# Altium PCB PCB1.PcbDoc (part 1 of 3)
Units mm, origin at the board's own origin, x right, y up, seen from the top; angles counter-clockwise.
Board outline 82.55 x 101.6 mm, 4 copper layers (Top Layer, GND, POWER, Bottom Layer), stack 1.586 mm thick; 125 components, 82 nets, 451 pads, 255 vias.
Unrouted connection lines stored in the file: 4.
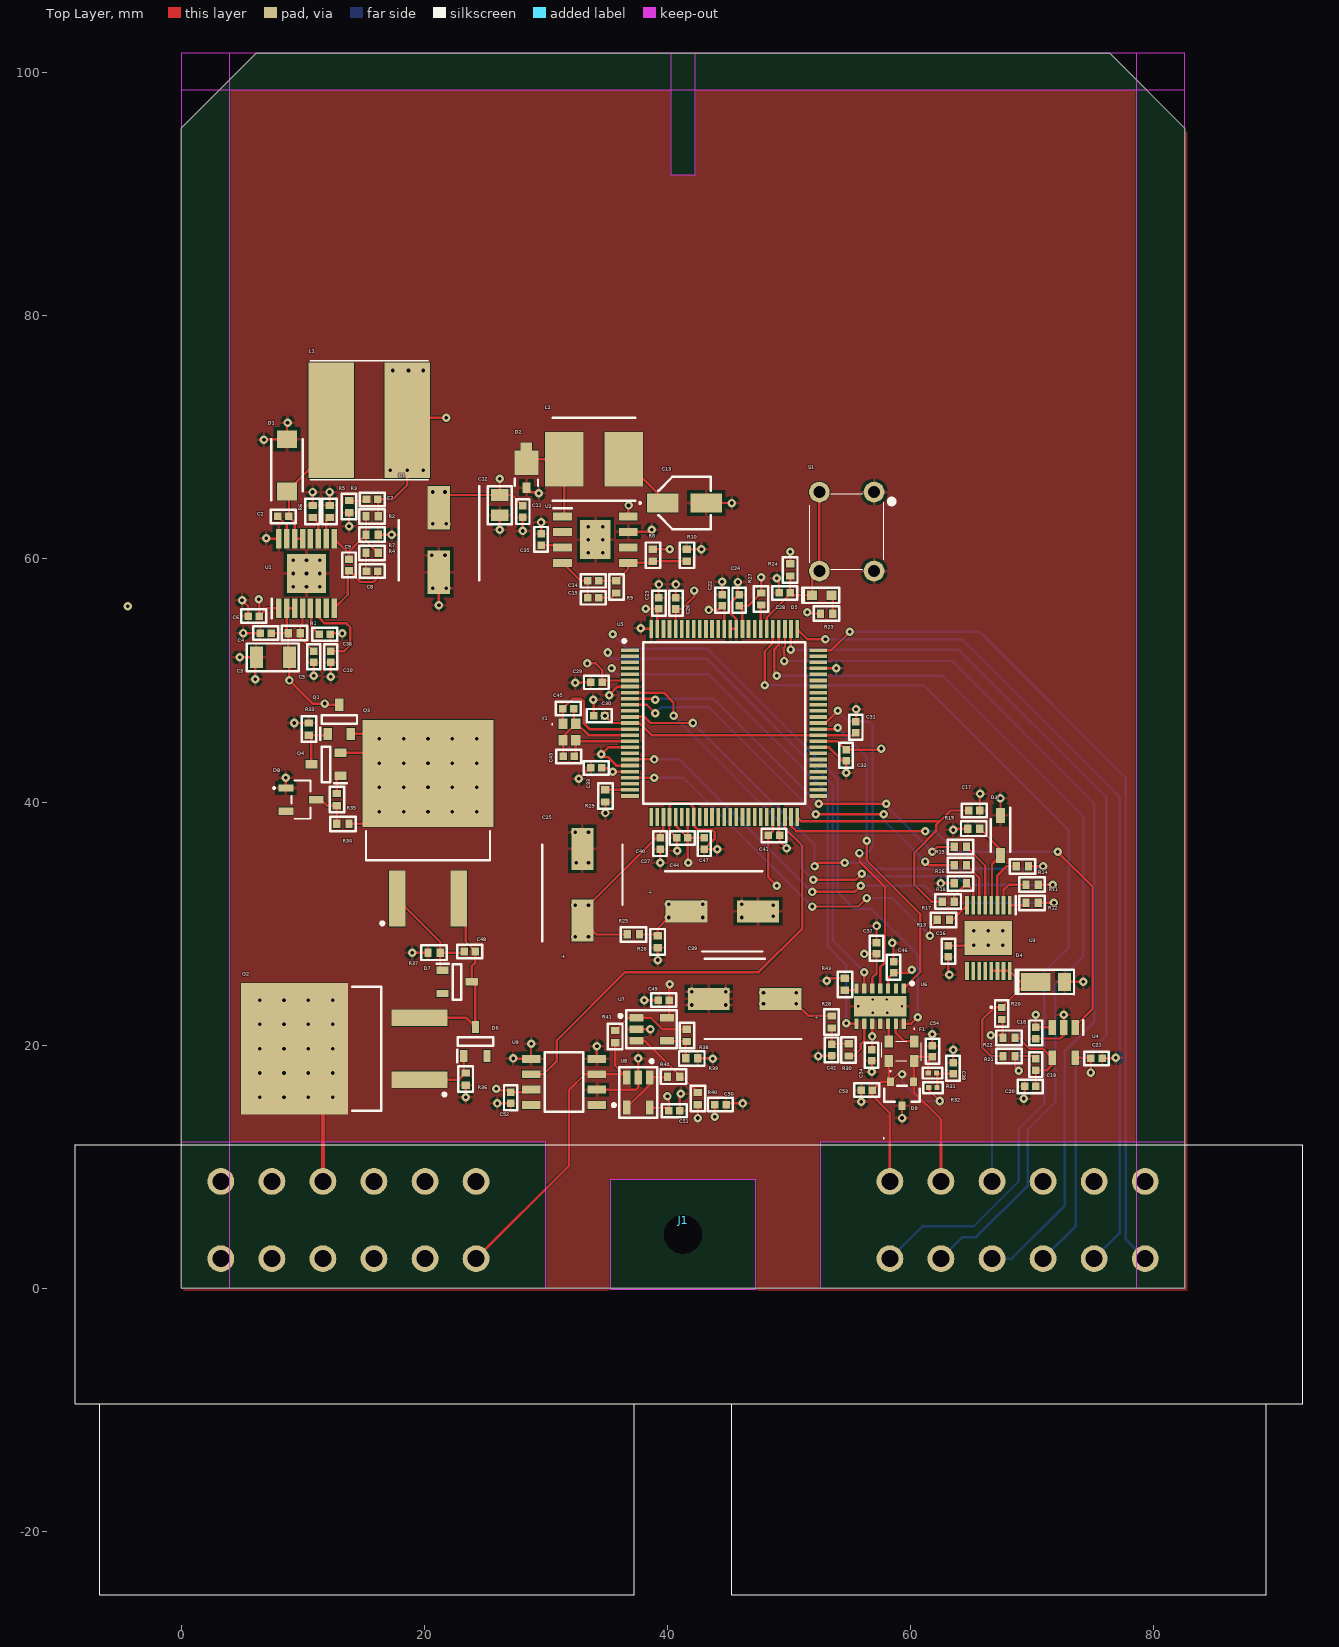
[diagram p0: Top Layer view]
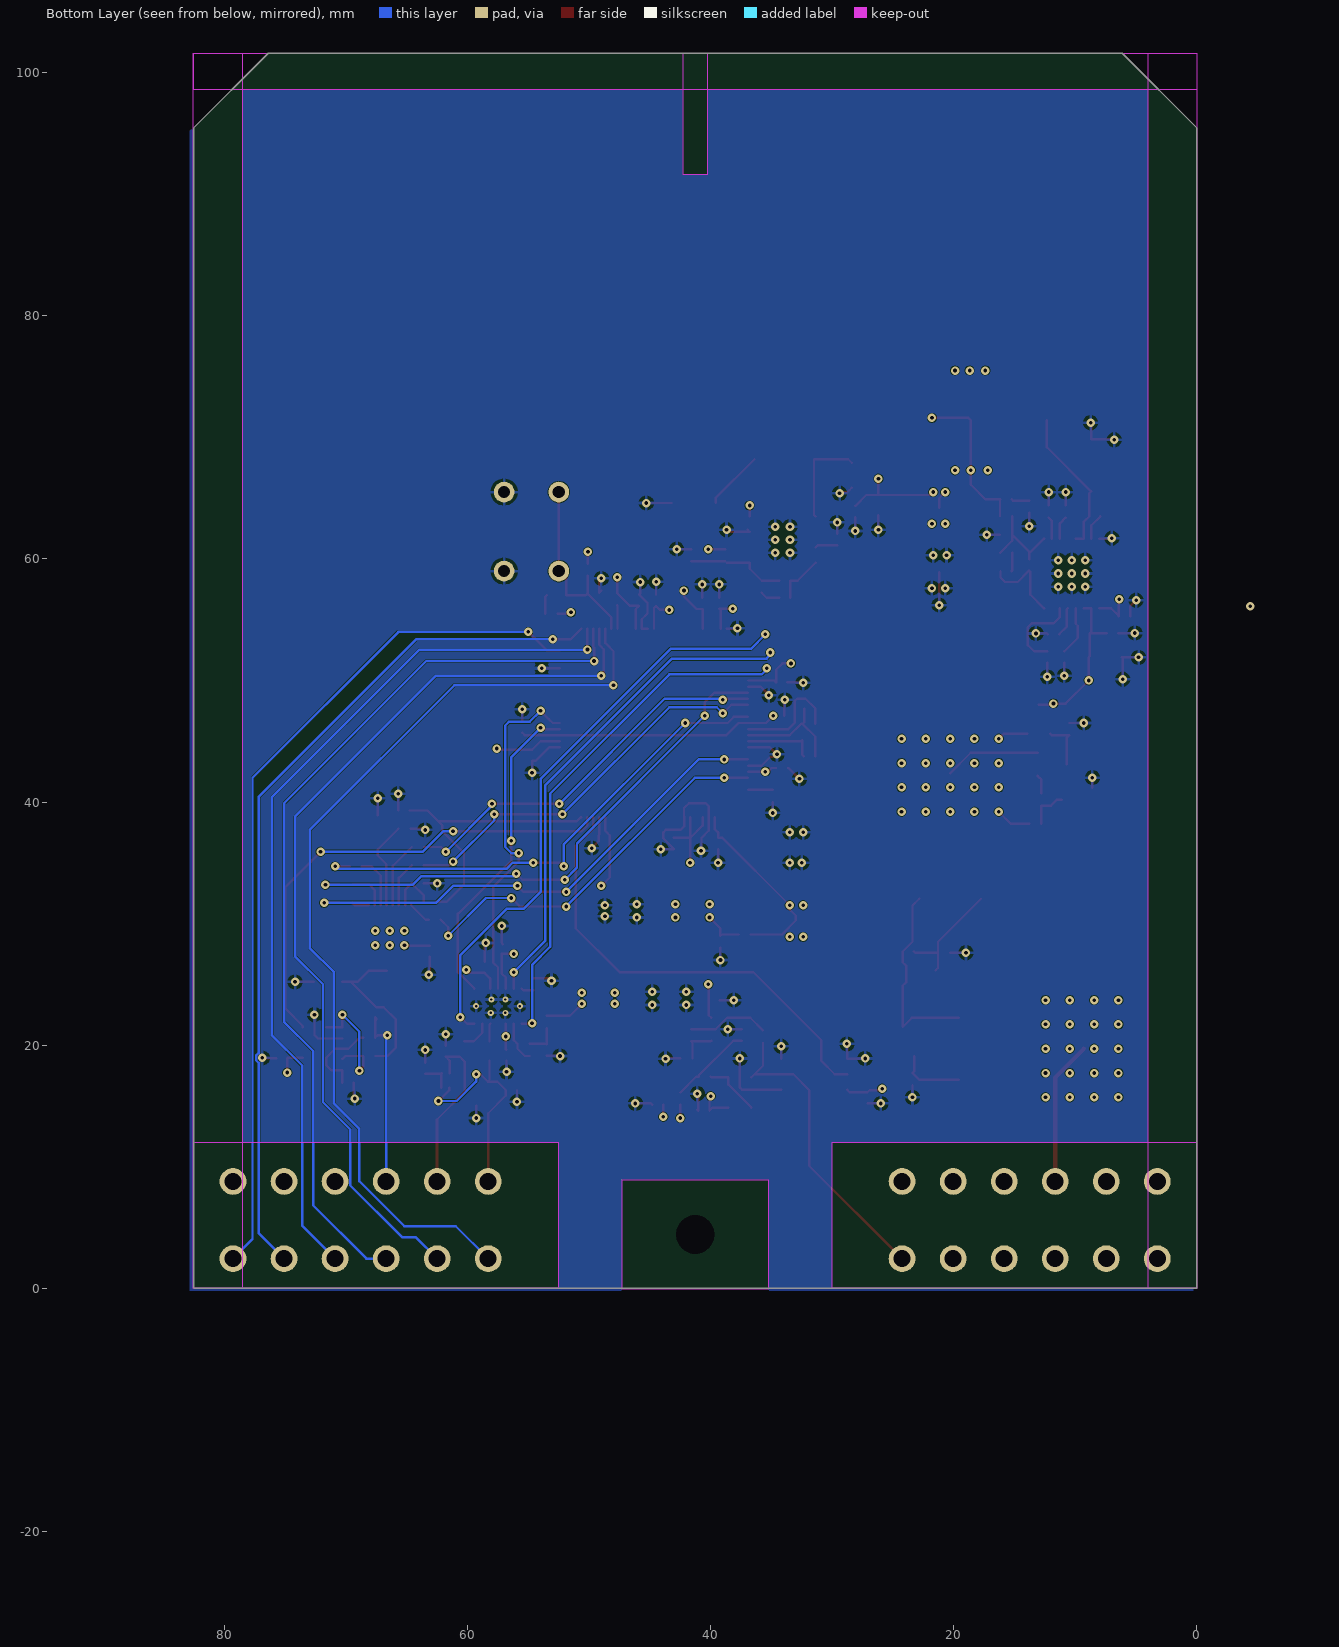
[diagram p1: Bottom Layer view, seen from below]
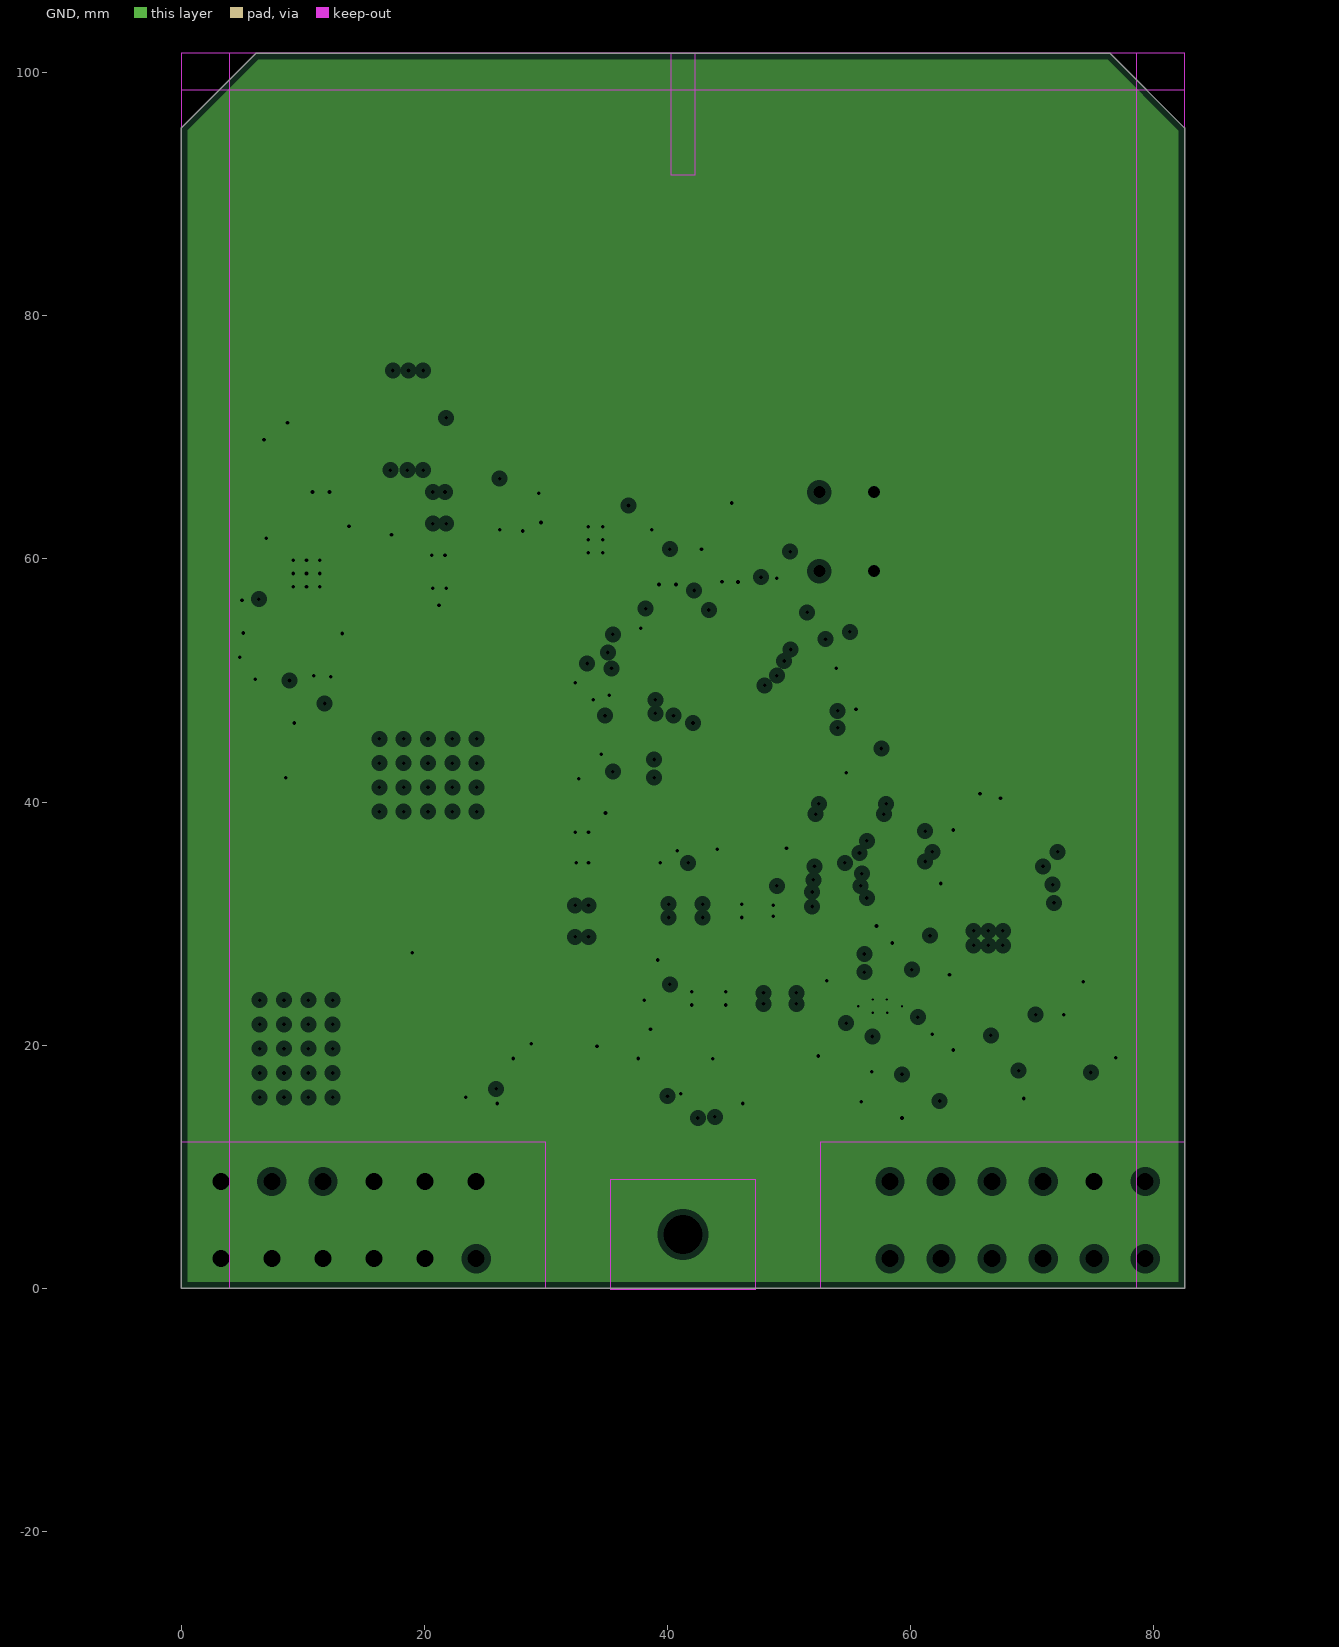
[diagram p2: GND, clearances drawn from the general rule]
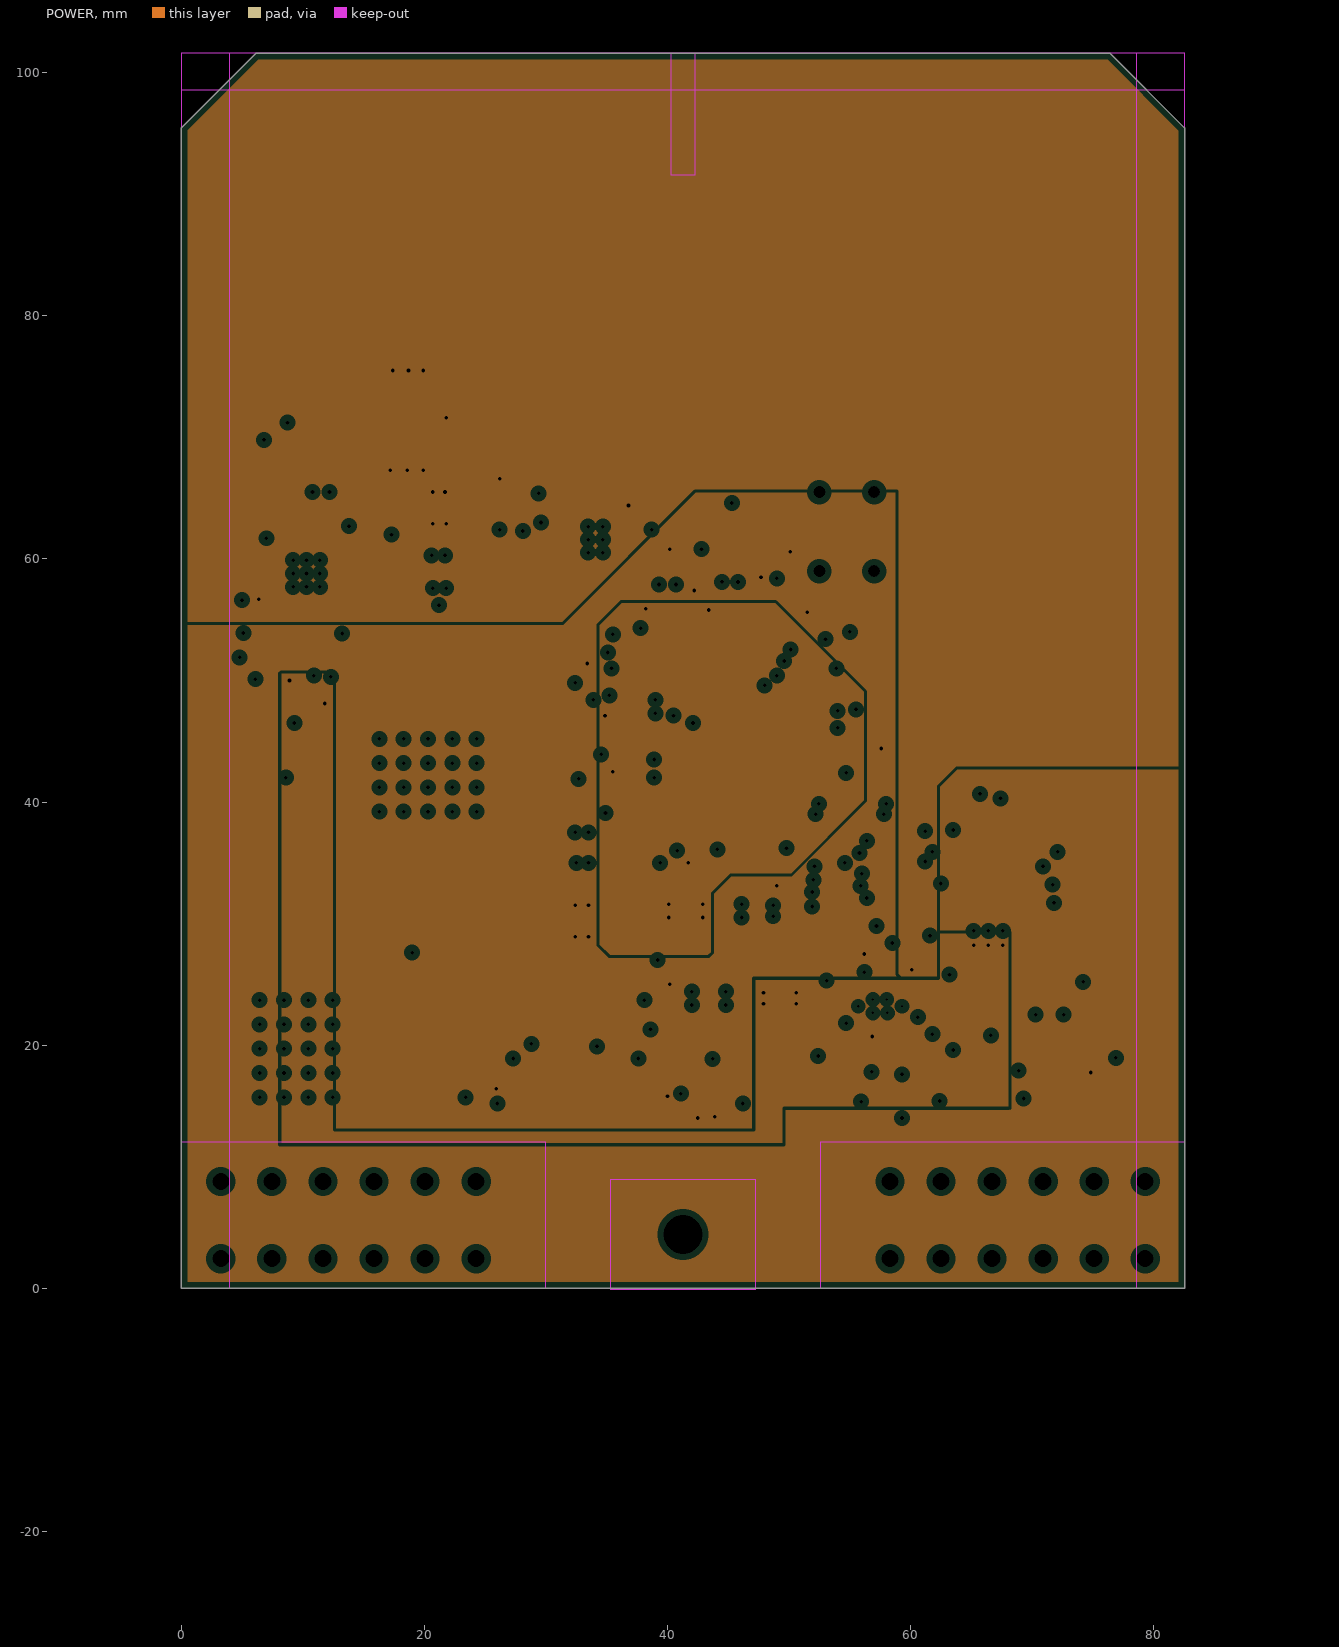
[diagram p3: POWER, clearances drawn from the general rule]
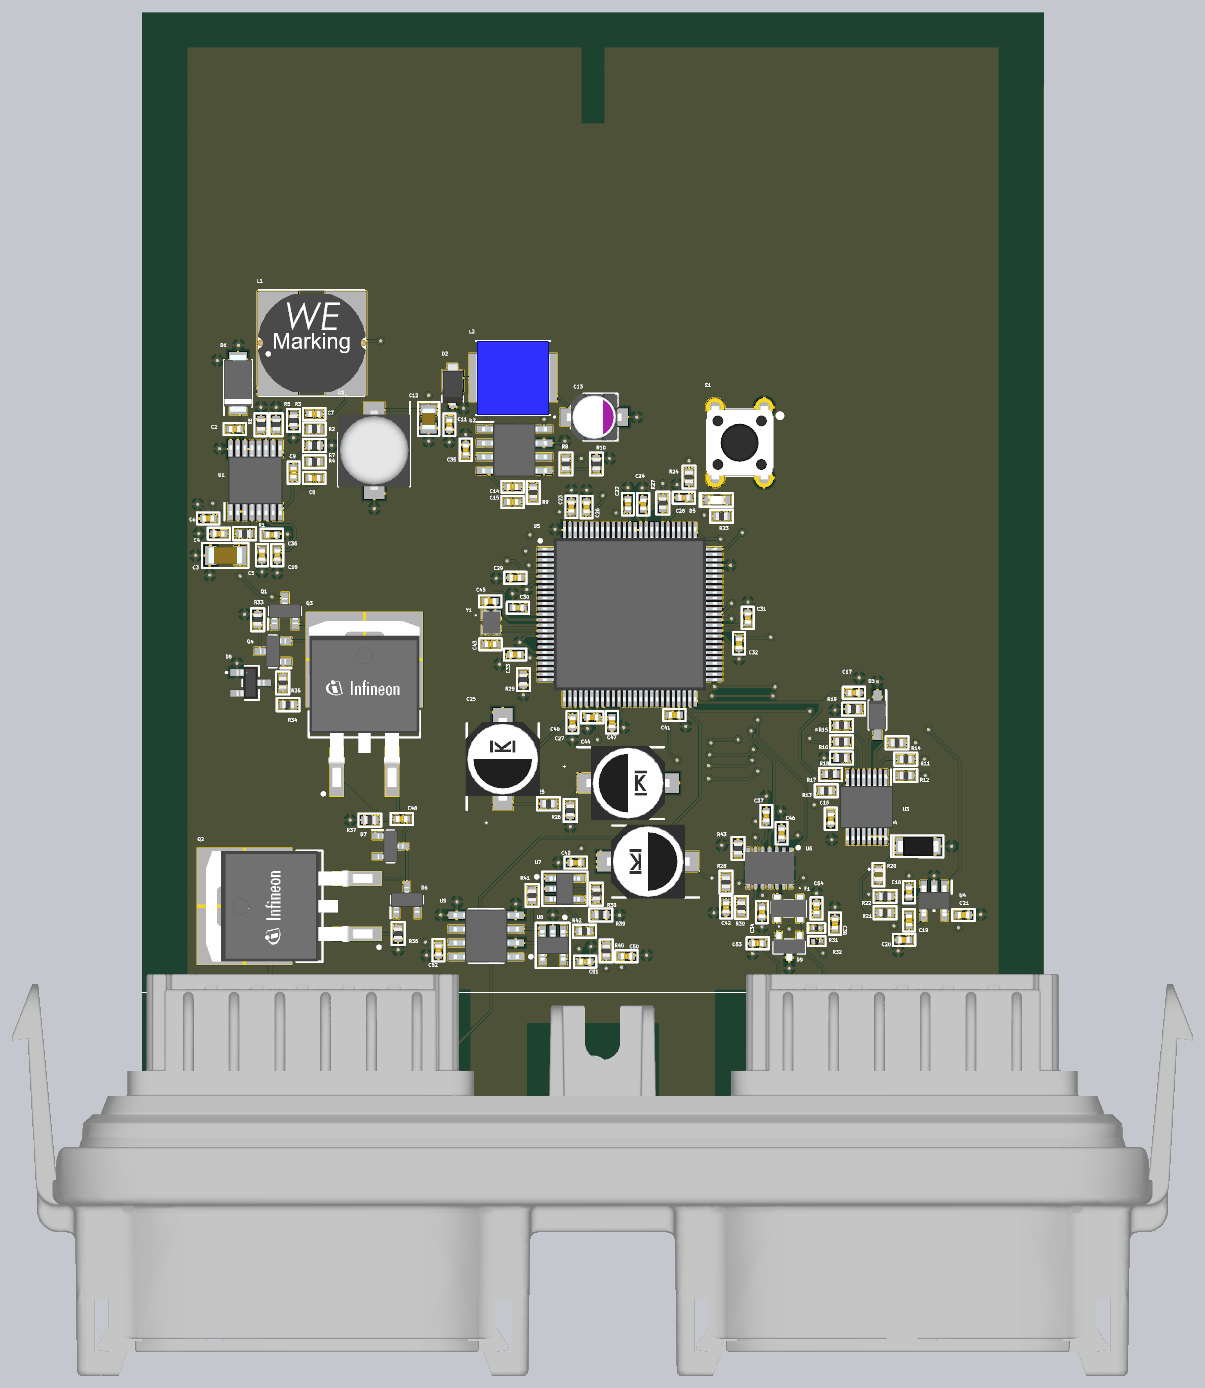
[diagram p5: 3D render of the assembled board from above, using the file's embedded part models]

## Layer stack, top to bottom
Top Solder: solder mask 0.0102, Solder Resist, Dk 3.5
Top Layer: signal copper 0.035
Dielectric 2: prepreg 0.2104, PP-006, Dk 4.1
GND: plane copper 0.0152, net GND
Dielectric 1: core 1.065, FR-4, Dk 4.8
POWER: plane copper 0.0152, net (Multiple Nets)
Dielectric 3: prepreg 0.2104, PP-006, Dk 4.1
Bottom Layer: signal copper 0.035
Bottom Solder: solder mask 0.0102, Solder Resist, Dk 3.5

## Board outline
0,0 0,95.456 6.144,101.6 76.406,101.6 82.55,95.456 82.55,0

## Design rules (kind name [scope] priority, off if disabled: settings)
Clearance [All] p1: gap=0.05 ignorepadtopadclearanceinfootprint=FALSE
DiffPairsRouting [All] p1: maxlimit=3 minlimit=0.07 mostfreqgap=1 toplayer_minwidth=0.2 toplayer_maxwidth=0.25 toplayer_prefwidth=0.25 bottomlayer_minwidth=0.2 bottomlayer_maxwidth=0.25 bottomlayer_prefwidth=0.25 maxuncoupledlength=12.7
HoleToHoleClearance [All] p1: gap=0.05 allowstackedmicrovias=TRUE
MinimumSolderMaskSliver [All] p1: minsoldermaskwidth=0.05
PlaneClearance [All] p1: clearance=0.508
PlaneConnect [All] p1: planeconnectstyle=Relief reliefexpansion=0.508 reliefentries=4 reliefconductorwidth=0.254 reliefairgap=0.254
PolygonConnect [All] p1: connectstyle=Relief reliefconductorwidth=0.254 reliefentries=4 polygonreliefangle="90 Angle" airgapwidth=0.254
RoutingVias [All] p1: holewidth=0.3 width=0.7 viastyle="Through Hole" minholewidth=0.3 minwidth=0.7 maxholewidth=0.3 maxwidth=0.7
SilkToSilkClearance [All] p1: silktosilkclearance=0.05
SilkToSolderMaskClearance [IsPad] p1: minsilkscreentomaskgap=0.05 clearancetoexposedcopper=TRUE
SolderMaskExpansion [All] p1: expansion=0.102 istentingtop=FALSE
SupplyNets "Schematic Supply Nets_5" [InNet('VBAT')] p1: voltage=0.000
SupplyNets "Schematic Supply Nets_4" [InNet('3V3')] p2: voltage=0.000
SupplyNets "Schematic Supply Nets_3" [InNet('1V2')] p3: voltage=0.000
SupplyNets "Schematic Supply Nets_2" [InNet('12V')] p4: voltage=0.000
SupplyNets "Schematic Supply Nets_1" [InNet('5V')] p5: voltage=0.000
SupplyNets "Schematic Supply Nets" [InNet('GND')] p6: voltage=0.000
Width [All] p1: maxlimit=0.35 minlimit=0.2 preferedwidth=0.2
23 further rules are at their usual default settings.

## Classes and differential pairs
component class NTC: C49 C50 C51 C52 R38 R39 R40 R41 R42 U7 U8 U9
component class Shunt: C18 C19 C20 C21 C34 C37 C38 C39 C42 C46 C53 C54 D9 F1 R20 R21 R22 R28 R30 R31 R32 R43 U4 U6
component class "Pump Driver": C16 C17 D3 D4 R11 R12 R13 R14 R15 R16 R17 R18 R19 U3
component class "Power Supply": C1 C2 C3 C4 C5 C6 C7 C8 C9 C10 C11 C12 C13 C14 C15 C35 C36 D1 D2 L1 L2 R1 R2 R3 R4 R5 R6 R7 R8 R9 R10 U1 U2
component class Microcontroller: C22 C23 C24 C25 C26 C27 C28 C29 C30 C31 C32 C33 C40 C41 C43 C44 C45 C47 D5 R23 R24 R25 R26 R27 R29 S1 U5 Y1
component class "Input Stage": C48 D6 D7 D8 J1 Q1 Q2 Q3 Q4 R33 R34 R35 R36 R37
differential pair CAN: +CAN_P -CAN_N

## Components (designator, comment, footprint, x,y, rotation, side; value= is the part's Value field where it differs from the comment)
C1 "15uF" CAPAE660X850N 21.2,61.55 r270 top
C2 "100nF" C0402 8.4,63.5 r0 top
C3 "4.7uF" CAPC3216X180N 7.54,51.9 r0 top
C4 "1uF" C0402 6.94,53.9 r0 top
C5 "1uF" C0402 10.9,51.94 r90 top
C6 "1uF" C0402 5.96,55.3 r180 top
C7 "680pF" C0402 15.7,64.9 r0 top
C8 "27nF" C0402 15.7,59 r180 top
C9 "220pF" C0402 13.8,59.5 r270 top
C10 "33nF" C0402 12.3,51.94 r90 top
C11 "220nF" C0402 28.1,63.9 r270 top
C12 "10uF" CAPC2012X145N 26.2,64.43 r90 top
C13 "33uF" 10SVPS10M 41.4,64.6 r0 top
C14 "270pF" C0402 33.9,58.2 r0 top
C15 "100nF" C0402 33.9,56.8 r0 top
C16 "100nF" C0402 63.119,27.73 r90 top
C17 "10nF" C0402 65.24,39.3 r180 top
C18 "1nF" C0402 70.3,21 r90 top
C19 "10nF" C0402 70.3,18.4 r270 top
C20 "1nF" C0402 69.84,16.6 r180 top
C21 "1uF" C0402 75.3,18.9 r180 top
C22 "100nF" C0402 44.5,56.6 r270 top
C23 "100nF" C0402 39.3,56.36 r270 top
C24 "100nF" C0402 45.9,56.6 r270 top
C25 "10uF" CAPAE660X565N 33,33.2 r90 top
C26 "100nF" C0402 40.7,56.34 r270 top
C27 "10uF" CAPAE660X565N 44.5,31 r0 top
C28 "100nF" C0402 49.64,57.2 r0 top
C29 "100nF" C0402 34.16,49.846 r0 top
C30 "100nF" C0402 34.4,47.1 r0 top
C31 "100nF" C0402 55.5,46.16 r270 top
C32 "100nF" C0402 54.7,43.84 r90 top
C33 "100nF" C0402 34.14,42.8 r0 top
C34 "100nF" C0402 56.8,19.16 r90 top
C35 "220nF" C0402 29.6,61.6 r90 top
C36 "1uF" C0402 11.8,53.8 r180 top
C37 "100nF" C0402 57.2,27.96 r270 top
C38 "4.7nF" C0402 63.5,18.1 r90 top
C39 "10uF" CAPAE660X565N 46.35,23.8 r180 top
C40 "100nF" C0402 39.395,36.585 r90 top
C41 "100nF" C0402 48.765,37.248 r180 top
C42 "22nF" C0402 53.5,19.6 r90 top
C43 "20pF" C0402 31.877,43.75 r0 top
C44 "100nF" C0402 41.221,37.045 r0 top
C45 "20pF" C0402 31.849,47.687 r180 top
C46 "100nF" C0402 58.6,26.4 r270 top
C47 "100nF" C0402 43.028,36.585 r90 top
C48 "1uF" C0402 23.74,27.7 r0 top
C49 "100nF" C0402 39.7,23.7 r0 top
C50 "100nF" C0402 44.36,15.1 r180 top
C51 "100nF" C0402 40.56,14.6 r180 top
C52 "100nF" C0402 27.1,15.66 r90 top
C53 "100pF" C0402 56.4,16.3 r180 top
C54 "100pF" C0402 61.8,19.5 r270 top
D1 "STPS2L25AFN" SODFL5226X110N 8.7,67.7 r90 top
D2 "STPS120MF" STPS120MF 28.4,67.5 r90 top
D3 "1N5819" SOD3716X125N 67.4,37.25 r270 top
D4 "DFLS1100-7" DFLS110 71.15,25.2 r0 top
D5 "150060AS75000" LED-0603 52.7,57 r0 top
D6 "BZX84C12" SOT96P237X111-3N 24.2,20.3 r90 top
D7 "BZX84C12" SOT96P237X111-3N 22.7,25.2 r0 top
D8 "BZX84B24" TRANS_BZX84_ROM-M 9.855,40.2 r270 top
D9 "PESD" PESD2CANFD36LTQR 59.3,16 r0 top
F1 "DLP31SN121ML2L" DLP31SN121ML2B 60.3,18.7 r270 top
J1 "ATM13-12PA-12PB-BM03" ATM1312PA12PBBM03 24.255,2.43 r0 top locked
L1 "12uH" WE-PD2_105455 15.475,71.4 r0 top
L2 "15uH" INDPM6868X420N 33.95,68.2 r0 top
Q1 "MMBT5401" SOT95P240X120-3N 13,46.8 r90 top
Q2 "IRF5210" TO254P1528X508-4_3N-V1 14.455,19.7 r180 top
Q3 "IRF5210" TO254P1528X508-4_3N-V1 20.3,37.2 r90 top
Q4 "MMBT5401" SOT95P240X120-3N 11.9,43.1 r180 top
R1 "0" R0402 9.3,53.9 r180 top
R2 "43k" R0402 15.7,63.5 r0 top value=43kR
R3 "1.3k" R0402 13.8,64.3 r90 top value=1.3kR
R4 "2.7k" R0402 15.7,60.5 r0 top value=2.7kR
R5 "51.1k" R0402 12.2,63.9 r270 top value=51.1kR
R6 "30k" R0402 10.8,63.9 r270 top value=30kR
R7 "8.2k" R0402 15.7,62 r180 top
R8 "4.7k" R0402 38.8,60.3 r90 top value=4.7kR
R9 "3.3k" R0402 35.8,57.7 r90 top value=3.3kR
R10 "1.05k" R0402 41.6,60.3 r270 top value=1.05kR
R11 "15k" R0402 70,33.2 r180 top
R12 "15k" R0402 70,31.7 r180 top
R13 "15k" R0402 62.7,30.3 r0 top
R14 "15k" R0402 69.2,34.7 r180 top
R15 "15k" R0402 64.1,36.3 r0 top
R16 "15k" R0402 64.1,34.8 r0 top
R17 "15k" R0402 63.1,31.8 r0 top
R18 "1k" R0402 64.1,33.3 r0 top
R19 "4.7k" R0402 65.2,37.8 r0 top value=4.7kR
R20 "10m" CSS0402FT10L0 67.5,22.6 r270 top
R21 "100R" R0402 68.1,19.1 r180 top
R22 "100R" R0402 68.1,20.6 r180 top
R23 "120R" R0402 53.1,55.5 r180 top
R24 "10k" R0402 50.1,59.1 r90 top
R25 "30k" R0402 37.2,29.1 r180 top value=30kR
R26 "17k2" R0402 39.2,28.5 r90 top value=17.2kR
R27 "10k" R0402 47.7,56.7 r90 top
R28 "3.3k" R0402 53.5,21.9 r90 top value=3.3kR
R29 "1k" R0402 34.9,40.5 r90 top
R30 "33k" R0402 54.9,19.6 r90 top
R31 "60R" R0201 61.8,17.7 r180 top
R32 "60R" R0201 61.84,16.5 r0 top
R33 "6k2" R0402 10.5,46 r90 top value=6.2kR
R34 "2k" R0402 13.3,38.2 r0 top
R35 "1k" R0402 12.8,40.2 r90 top
R36 "10R" R0402 23.4,17.2 r90 top
R37 "10R" R0402 20.8,27.6 r0 top
R38 "10k" R0402 41.6,20.8 r270 top
R39 "10k" R0402 42,18.9 r0 top
R40 "10k" R0402 42.5,15.6 r270 top
R41 "33k" R0402 35.7,20.7 r90 top
R42 "10k" R0402 40.5,17.4 r0 top
R43 "10k" R0402 54.6,25 r270 top
S1 "Pushbutton" Pushbutton 54.75,62.25 r270 top
U1 "A7987" SOP65P640X120-17N 10.3,58.8 r90 top
U2 "A7985A" SOIC127P600X170-9N 34.077,61.585 r0 top
U3 "VND7020AJ" SOP50P600X170-17N 66.4,28.8 r270 top
U4 "INA193" SOT95P280X145-5N 72.6,20.2 r270 top
U5 "TMS570" QFP50P1600X1600X160-100N 44.67,46.499 r0 top locked
U6 "TCAN1043" SON65P300X450X90-15N 57.5,23.2 r270 top
U7 "AD8538AUJZ" SOT95P280X100-5N 38.7,21.3 r0 top
U8 "AD8538AUJZ" SOT95P280X100-5N 37.6,16.1 r270 top
U9 "MAX4194" SOIC127P600X175-8N 31.488,16.965 r180 top
Y1 "16MHz" ECS1601037B2CTNTR 31.928,45.757 r270 top

## Footprints (in the part's own frame and the unit in brackets; to place one, negate y for a bottom-side part, rotate by r counter-clockwise, add the part's x,y. Pads: shape width x height; smd on the part's side, far side on the other; paste and mask are expansions set on the pad)
10SVPS10M [mm]
  rect 2.6x1.6 smd: 1(-1.8,0) 2(1.8,0)
  silkscreen extent -3.7,-2.15 2.15,2.15, body extent -2.5,-2.15 2.5,2.15, height 5.43
ATM1312PA12PBBM03 [mm]
  round 2.2 hole 1.4: A1(0,0) A2(-4.2,0) A3(-8.4,0) A4(-12.6,0) A5(-16.8,0) A6(-21,0) A7(-21,6.35) A8(-16.8,6.35) A9(-12.6,6.35) A10(-8.4,6.35) A11(-4.2,6.35) A12(0,6.35) B1(34.05,6.35) B2(38.25,6.35) B3(42.45,6.35) B4(46.65,6.35) B5(50.85,6.35) B6(55.05,6.35) B7(55.05,0) B8(50.85,0) B9(46.65,0) B10(42.45,0) B11(38.25,0) B12(34.05,0)
  round 1.6 hole 3.2 unplated: MH1(17.02,1.98)
  silkscreen extent -32.97,-27.65 68.02,9.95, body extent -36.24,-25.85 72.06,11.05, height 25.1
C0402 [mm]
  rect 0.62x0.62 smd: 1(-0.46,0) 2(0.46,0)
  silkscreen extent -1.02,-0.55 1.02,0.55, body extent -0.53,-0.28 0.53,0.27, height 0.55
CAPAE660X565N [mm]
  rect 3.45x1.8 smd: 1(-2.95,0) 2(2.95,0)
  silkscreen extent -4.67,-3.3 3.3,3.3, body extent -3.8,-3.4 3.8,3.4, height 5.66
CAPAE660X850N [mm]
  rect 3.6x1.85 smd: 1(-2.65,0) 2(2.65,0)
  silkscreen extent -4.45,-3.3 3.3,3.3, body extent -3.65,-3.3 3.65,3.3, height 8
CAPC2012X145N [mm]
  rect 0.97x1.47 smd: 1(-0.83,0) 2(0.83,0)
  silkscreen extent -1.58,-0.97 1.55,0.97, body extent -1,-0.63 1,0.63, height 1.45
CAPC3216X180N [mm]
  rect 1.07x1.78 smd: 1(-1.36,0) 2(1.36,0)
  silkscreen extent -2.16,-1.14 2.12,1.14, body extent -1.6,-0.8 1.6,0.8, height 1.8
CSS0402FT10L0 [mm]
  rect 0.6x0.6 smd: 1(-0.5,0) 2(0.5,0)
  silkscreen extent -1.07,-0.9 1.07,0.53, body extent -0.57,-0.36 0.57,0.36, height 0.41
DFLS110 [mm]
  rect 2.4x1.5 smd: 1(-0.85,0)
  rect 1.05x1.5 smd: 2(1.525,0)
  silkscreen extent -2.5,-1.02 2.3,1, body extent -1.85,-0.9 1.85,0.88, height 0.98
DLP31SN121ML2B [mm]
  rect 1x0.7 smd: 1(-1.6,0) 2(0,0) 3(0,-2.1) 4(-1.6,-2.1)
  silkscreen extent -2.7,-2.65 0,0.6, body extent -2.03,-2.65 0.43,0.55, height 1.4
ECS1601037B2CTNTR [mm]
  rect 0.85x0.75 smd: 1(-0.675,-0.525) 2(0.675,-0.525) 3(0.675,0.525) 4(-0.675,0.525)
  silkscreen extent -0.7,-1.45 -0.6,-1.35, body extent -1.02,-0.82 1.02,0.82, height 0.6
INDPM6868X420N [mm]
  rect 3.15x4.45 smd: 1(-2.45,0) 2(2.45,0)
  silkscreen extent -3.4,-3.4 3.4,3.4, body extent -3.4,-3.4 3.4,3.4, height 4.2
LED-0603 [mm]
  rect 0.8x0.8 smd: 1(-0.8,0) 2(0.8,0)
  silkscreen extent -1.63,-0.63 1.43,0.63, body extent -0.85,-0.43 0.75,0.37, height 0.81
PESD2CANFD36LTQR [mm]
  rect 0.6x0.7 smd: 1(-0.95,1) 2(0.95,1) 3(0,-1)
  silkscreen extent -1.45,-0.65 1.45,1.9, body extent -1.45,-1.29 1.45,1.29, height 1.2
Pushbutton [mm]
  round 1.7 hole 1: 1(-3.25,2.25) 2(3.25,2.25) 3(-3.25,-2.25) 4(3.25,-2.25)
  silkscreen extent -3.1,-3.05 3.1,3.9, body extent -3.9,-3 3.9,3, height 7
QFP50P1600X1600X160-100N [mm]
  rect 1.475x0.3 smd: 1(-7.738,6) 2(-7.738,5.5) 3(-7.738,5) 4(-7.738,4.5) 5(-7.738,4) 6(-7.738,3.5) 7(-7.738,3) 8(-7.738,2.5) 9(-7.738,2) 10(-7.738,1.5) 11(-7.738,1) 12(-7.738,0.5) 13(-7.738,0) 14(-7.738,-0.5) 15(-7.738,-1) 16(-7.738,-1.5) 17(-7.738,-2) 18(-7.738,-2.5) 19(-7.738,-3) 20(-7.738,-3.5) 21(-7.738,-4) 22(-7.738,-4.5) 23(-7.738,-5) 24(-7.738,-5.5) 25(-7.738,-6) 51(7.738,-6) 52(7.738,-5.5) 53(7.738,-5) 54(7.738,-4.5) 55(7.738,-4) 56(7.738,-3.5) 57(7.738,-3) 58(7.738,-2.5) 59(7.738,-2) 60(7.738,-1.5) 61(7.738,-1) 62(7.738,-0.5) 63(7.738,0) 64(7.738,0.5) 65(7.738,1) 66(7.738,1.5) 67(7.738,2) 68(7.738,2.5) 69(7.738,3) 70(7.738,3.5) 71(7.738,4) 72(7.738,4.5) 73(7.738,5) 74(7.738,5.5) 75(7.738,6)
  rect 0.3x1.475 smd: 26(-6,-7.738) 27(-5.5,-7.738) 28(-5,-7.738) 29(-4.5,-7.738) 30(-4,-7.738) 31(-3.5,-7.738) 32(-3,-7.738) 33(-2.5,-7.738) 34(-2,-7.738) 35(-1.5,-7.738) 36(-1,-7.738) 37(-0.5,-7.738) 38(0,-7.738) 39(0.5,-7.738) 40(1,-7.738) 41(1.5,-7.738) 42(2,-7.738) 43(2.5,-7.738) 44(3,-7.738) 45(3.5,-7.738) 46(4,-7.738) 47(4.5,-7.738) 48(5,-7.738) 49(5.5,-7.738) 50(6,-7.738) 76(6,7.738) 77(5.5,7.738) 78(5,7.738) 79(4.5,7.738) 80(4,7.738) 81(3.5,7.738) 82(3,7.738) 83(2.5,7.738) 84(2,7.738) 85(1.5,7.738) 86(1,7.738) 87(0.5,7.738) 88(0,7.738) 89(-0.5,7.738) 90(-1,7.738) 91(-1.5,7.738) 92(-2,7.738) 93(-2.5,7.738) 94(-3,7.738) 95(-3.5,7.738) 96(-4,7.738) 97(-4.5,7.738) 98(-5,7.738) 99(-5.5,7.738) 100(-6,7.738)
  silkscreen extent -8.35,-6.65 6.65,6.87, body extent -8,-8 8,8, height 1.6
R0201 [mm]
  rect 0.44x0.42 smd: 1(-0.34,0) 2(0.34,0)
  silkscreen extent -0.8,-0.45 0.8,0.45, body extent -0.3,-0.15 0.3,0.15, height 0.26
R0402 [mm]
  rect 0.6x0.7 smd: 1(-0.5,0) 2(0.5,0)
  silkscreen extent -1.05,-0.6 1.05,0.6, body extent -0.53,-0.35 0.53,0.36, height 0.51
SOD3716X125N [mm]
  rect 1.25x0.75 smd: 1(-1.65,0) 2(1.65,0)
  silkscreen extent -2.27,-0.8 1.35,0.8, body extent -1.35,-0.8 1.35,0.8, height 1.25
SODFL5226X110N [mm]
  rect 1.46x1.67 smd: 1(-2.15,0) 2(2.15,0)
  silkscreen extent -2.88,-1.29 2.14,1.29, body extent -2.59,-1.29 2.59,1.29, height 1.1
SOIC127P600X170-9N [mm]
  rect 1.525x0.65 smd: 1(-2.712,1.905) 2(-2.712,0.635) 3(-2.712,-0.635) 4(-2.712,-1.905) 5(2.712,-1.905) 6(2.712,-0.635) 7(2.712,0.635) 8(2.712,1.905)
  rect 2.51x3.2 smd paste-4: 9(0,0)
  silkscreen extent -3.47,2.58 -1.95,2.58, body extent -3,-2.45 3,2.45, height 1.7
SOIC127P600X175-8N [mm]
  rect 1.525x0.65 smd: 1(-2.712,1.905) 2(-2.712,0.635) 3(-2.712,-0.635) 4(-2.712,-1.905) 5(2.712,-1.905) 6(2.712,-0.635) 7(2.712,0.635) 8(2.712,1.905)
  silkscreen extent -4.23,-2.45 1.6,2.45, body extent -3,-2.45 3,2.45, height 1.75
SON65P300X450X90-15N [mm]
  rect 0.85x0.35 smd: 1(-1.45,1.95) 2(-1.45,1.3) 3(-1.45,0.65) 4(-1.45,0) 5(-1.45,-0.65) 6(-1.45,-1.3) 7(-1.45,-1.95) 8(1.45,-1.95) 9(1.45,-1.3) 10(1.45,-0.65) 11(1.45,0) 12(1.45,0.65) 13(1.45,1.3) 14(1.45,1.95)
  rect 1.7x4.3 smd paste-5: 15(0,0)
  silkscreen extent -2,2.5 -1.75,2.75, body extent -1.55,-2.25 1.55,2.25, height 0.9
SOP50P600X170-17N [mm]
  rect 1.5x0.3 smd: 1(-2.7,1.75) 2(-2.7,1.25) 3(-2.7,0.75) 4(-2.7,0.25) 5(-2.7,-0.25) 6(-2.7,-0.75) 7(-2.7,-1.25) 8(-2.7,-1.75) 9(2.7,-1.75) 10(2.7,-1.25) 11(2.7,-0.75) 12(2.7,-0.25) 13(2.7,0.25) 14(2.7,0.75) 15(2.7,1.25) 16(2.7,1.75)
  rect 2.8x3.91 smd paste-4: 17(0,0)
  silkscreen extent -3.45,2.25 -1.95,2.25, body extent -3,-2.45 3,2.45, height 1.7
SOP65P640X120-17N [mm]
  rect 1.6x0.45 smd: 1(-2.875,2.275) 2(-2.875,1.625) 3(-2.875,0.975) 4(-2.875,0.325) 5(-2.875,-0.325) 6(-2.875,-0.975) 7(-2.875,-1.625) 8(-2.875,-2.275) 9(2.875,-2.275) 10(2.875,-1.625) 11(2.875,-0.975) 12(2.875,-0.325) 13(2.875,0.325) 14(2.875,0.975) 15(2.875,1.625) 16(2.875,2.275)
  rect 3.2x3.2 smd paste-3: 17(0,0)
  silkscreen extent -3.67,2.85 -2.07,2.85, body extent -3.2,-2.5 3.2,2.5, height 1.2
SOT95P240X120-3N [mm]
  rect 1x0.7 smd: 1(-1.2,0.95) 2(-1.2,-0.95) 3(1.2,0)
  silkscreen extent -1.7,-1.46 0.35,1.55, body extent -1.2,-1.46 1.2,1.46, height 1.2
SOT95P280X100-5N [mm]
  rect 1.15x0.6 smd: 1(-1.25,0.95) 2(-1.25,0) 3(-1.25,-0.95) 4(1.25,-0.95) 5(1.25,0.95)
  silkscreen extent -2.7,-1.58 2.07,1.58, body extent -1.4,-1.45 1.4,1.45, height 1
SOT95P280X145-5N [mm]
  rect 1.2x0.6 smd: 1(-1.25,0.95) 2(-1.25,0) 3(-1.25,-0.95) 4(1.25,-0.95) 5(1.25,0.95)
  silkscreen extent -1.85,1.63 -0.65,1.63, body extent -1.4,-1.45 1.4,1.45, height 1.2
SOT96P237X111-3N [mm]
  rect 1x0.6 smd: 1(-1.2,0.955) 2(-1.2,-0.955) 3(1.2,0)
  silkscreen extent -1.7,-1.46 0.35,1.51, body extent -1.18,-1.46 1.18,1.46, height 1.11
STPS120MF [mm]
  rect 0.85x0.65 smd: 1(-1.64,0)
  rect 2x1.95 smd: 2(0.415,0)
  rect 0.65x0.95 smd: 3(1.74,0)
  silkscreen extent -1.5,-0.95 -0.9,0.95, body extent -1.86,-0.96 1.94,0.96, height 0.85
TO254P1528X508-4_3N-V1 [mm] "TO,2.54mm pitch;3 pin,15.28mm L X 9.00mm W X 5.08mm H body"
  rect 4.6x1.35 smd paste-0.05 mask+0: 1(-5.155,2.54) 3(-5.155,-2.54)
  rect 8.8x10.8 smd paste-4.4 mask+0: 2(5.155,0)
  silkscreen extent -7.31,-5.1 0.4,5.1, body extent -6.59,-5.08 8.69,5.08, height 5.09
TRANS_BZX84_ROM-M [mil]
  rect 24x48 smd paste+0 mask+0: 1(-37.4,-49) 2(37.4,-49) 3(0,49)
  silkscreen extent -62,-91 62,31, body extent -57,-51 57,51, height 45
WE-PD2_105455 [mm]
  rect 3.75x9.5 smd: 1(-3.125,0) 2(3.125,0)
  silkscreen extent -4.86,-4.89 4.84,4.89, body extent -5.04,-4.5 5.04,4.5, height 5.4

## Part data
C1: library part AHA0608150M050R, "Hybrid Aluminum V-Chip, 15uF, 50V", Manufacturer="Kyocera AVX", Supplier Part Number=581-AHA0608150M050R, Category="Polymer Capacitors", Manufacturer Part Number=AHA0608150M050R, Pricing="1=0.93, 10=0.586, 50=0.586, 100=0.582, 1000=0.494, 10000=0.262 (USD)", RoHS=No, Stock=134, Supplier=Mouser
C2 C15 C16 C22 C23 C24 C26 C28 C29 C30 C31 C32 C33 C34 C37 C40 C41 C44 C46 C47 C49 C50 C51 C52: library part C0402C104K3PACTU, "Ceramic Capacitor, Multilayer, Ceramic, 25V, 10% +Tol, 10% -Tol, X5R, 15% TC, 0.1uF, Surface Mount, 0402", Capacitor Type=Ceramic, Case/Package=0402, Manufacturer=KEMET, Max Operating Temperature=85°C, Min Operating Temperature=-55°C, Package Shape=Rectangular, Rated DC Voltage (URdc)=25V, Supplier Part Number=80-C0402C104K3P, Temperature Characteristics Code=X5R, Tolerance  (fill in as +-)=10%, Category="Ceramic Capacitors", ComponentLink1Description=https://datasheet.ciiva.com:443/pdfs/VipMasterIC/IC/KEME/KEME-S-A0008991665/KEME-S-A0008991665-1.pdf?src-supplier=IHS+Markit, ComponentLink1URL=https://datasheet.ciiva.com:443/pdfs/VipMasterIC/IC/KEME/KEME-S-A0008991665/KEME-S-A0008991665-1.pdf?src-supplier=IHS+Markit, ComponentLink2Description=http://www.farnell.com/datasheets/2748284.pdf?src-supplier=Farnell, ComponentLink2URL=http://www.farnell.com/datasheets/2748284.pdf?src-supplier=Farnell, ComponentLink3Description=http://www.farnell.com/datasheets/2748284.pdf?src-supplier=Newark, ComponentLink3URL=http://www.farnell.com/datasheets/2748284.pdf?src-supplier=Newark, ComponentLink4Description=https://datasheet.octopart.com/C0402C104K3PACTU-KEMET-datasheet-181956028.pdf?src-supplier=Element14, ComponentLink4URL=https://datasheet.octopart.com/C0402C104K3PACTU-KEMET-datasheet-181956028.pdf?src-supplier=Element14, Dielectric Material=Ceramic, JESD-609 Code=e3, Manufacturer Part Number=C0402C104K3PACTU, Mounting Technology="Surface Mount", Multilayer=Yes, Packaging="Tape and Reel", Pins=2, Pricing="1=0.12, 10=0.056, 50=0.056, 100=0.036, 1000=0.026, 10000=0.017 (USD)", Reach SVHC Compliant=Yes, RoHS=Yes, RoHS Compliant=Yes, Stock=262570, Supplier=Mouser, Terminal Finish=Nickel, Termination=Wraparound, Tolerance (fill in as +-)=10%
C3: library part EMK316BJ475MLHT, "Ceramic Capacitor, Multilayer, Ceramic, 16V, 20% +Tol, 20% -Tol, X5R, 15% TC, 4.7uF, Surface Mount, 1206", Manufacturer="Taiyo Yuden", Supplier Part Number=963-EMK316BJ475MLHT, Category="Ceramic Capacitors", ComponentLink1Description="https://ds.yuden.co.jp/TYCOMPAS/ut/detail?pn=EMK316BJ475MLHT &amp;u=M&src-supplier=Digikey", ComponentLink1URL="https://ds.yuden.co.jp/TYCOMPAS/ut/detail?pn=EMK316BJ475MLHT &amp;u=M&src-supplier=Digikey", Manufacturer Part Number=EMK316BJ475MLHT, Pricing="1=0.3, 10=0.182, 50=0.182, 100=0.118, 1000=0.085, 10000=0.063 (USD)", RoHS=No, Supplier=Mouser
C4 C5 C6 C21 C36 C48: library part C0402C105K4PAC7411, "Ceramic Capacitor, Multilayer, Ceramic, 16V, 10% +Tol, 10% -Tol, X5R, 15% TC, 1uF, Surface Mount, 0402", Capacitor Type=Ceramic, Case/Package=0402, Manufacturer=KEMET, Max Operating Temperature=85°C, Min Operating Temperature=-55°C, Package Shape=Rectangular, Rated DC Voltage (URdc)=16V, Supplier Part Number=80-C0402C105K4P7411, Temperature Characteristics Code=X5R, Tolerance  (fill in as +-)=10%, Category="Ceramic Capacitors", ComponentLink1Description=https://datasheet.ciiva.com:443/pdfs/VipMasterIC/IC/KEME/KEME-S-A0008991665/KEME-S-A0008991665-1.pdf?src-supplier=IHS+Markit, ComponentLink1URL=https://datasheet.ciiva.com:443/pdfs/VipMasterIC/IC/KEME/KEME-S-A0008991665/KEME-S-A0008991665-1.pdf?src-supplier=IHS+Markit, ComponentLink2Description=https://api.kemet.com/component-edge/download/datasheet/C0402C105K4PAC7411.pdf?src-supplier=Digikey, ComponentLink2URL=https://api.kemet.com/component-edge/download/datasheet/C0402C105K4PAC7411.pdf?src-supplier=Digikey, ComponentLink3Description=https://datasheet.octopart.com/C0402C105K4PAC7411-KEMET-datasheet-142027389.pdf?src-supplier=Farnell, ComponentLink3URL=https://datasheet.octopart.com/C0402C105K4PAC7411-KEMET-datasheet-142027389.pdf?src-supplier=Farnell, Dielectric Material=Ceramic, Manufacturer Part Number=C0402C105K4PAC7411, Mounting Technology="Surface Mount", Multilayer=Yes, Packaging="Tape and Reel", Pins=2, Pricing="1=0.11, 10=0.061, 50=0.061, 100=0.037, 1000=0.024, 10000=0.019 (USD)", Reach SVHC Compliant=Yes, RoHS=Yes, RoHS Compliant=Yes, Stock=78488, Supplier=Mouser, Termination=Wraparound, Tolerance (fill in as +-)=10%
C7: library part C0402C681K8RACTU, "Ceramic Capacitor, Multilayer, Ceramic, 10V, 10% +Tol, 10% -Tol, X7R, 15% TC, 0.00068uF, Surface Mount, 0402", Capacitor Type=Ceramic, Case/Package=0402, Manufacturer=KEMET, Max Operating Temperature=125°C, Min Operating Temperature=-55°C, Package Shape=Rectangular, Package Style=SMTMeter, Rated DC Voltage (URdc)=10V, Supplier Part Number=80-C0402C681K8RACTU, Temperature Characteristics Code=X7R, Tolerance  (fill in as +-)=10%, Category=Capacitors, ComponentLink1Description=https://datasheet.ciiva.com:443/pdfs/VipMasterIC/IC/KEME/KEME-S-A0008991654/KEME-S-A0008991654-1.pdf?src-supplier=IHS+Markit, ComponentLink1URL=https://datasheet.ciiva.com:443/pdfs/VipMasterIC/IC/KEME/KEME-S-A0008991654/KEME-S-A0008991654-1.pdf?src-supplier=IHS+Markit, Dielectric Material=Ceramic, Height=0.5mm, JESD-609 Code=e3, Length=1mm, Manufacturer Part Number=C0402C681K8RACTU, Mounting Technology="Surface Mount", Multilayer=Yes, Packaging="Tape and Reel", Pins=2, Pricing="1=0.34, 10=0.202, 50=0.202, 100=0.132, 1000=0.095, 10000=0.077 (USD)", Reach SVHC Compliant=Yes, RoHS=Yes, RoHS Compliant=Yes, Stock=44783, Supplier=Mouser, Terminal Finish=Nickel, Termination=Wraparound, Tolerance (fill in as +-)=10%, Width=0.5mm
C8: library part C0402C273K4RALTU, ".027Uf 16.0V Rohs Compliant: No", Manufacturer=KEMET, Supplier Part Number=80-C0402C273K4RALTU, Manufacturer Part Number=C0402C273K4RALTU, Pricing="1=0.57, 10=0.374, 50=0.374, 100=0.225, 1000=0.167, 10000=0.115 (USD)", RoHS=No, Stock=9745, Supplier=Mouser
C9: library part C0402S221K5RACAUTO, "Ceramic Capacitor, Multilayer, Ceramic, 50V, 10% +Tol, 10% -Tol, X7R, 15% TC, 0.00022uF, Surface Mount, 0402", Capacitor Type=Ceramic, Manufacturer=KEMET, Supplier Part Number=80-C0402S221K5RAUTO, Category="Ceramic Capacitors", ComponentLink1Description=https://datasheet.ciiva.com:443/pdfs/VipMasterIC/IC/KEME/KEME-S-A0008958426/KEME-S-A0008958426-1.pdf?src-supplier=IHS+Markit, ComponentLink1URL=https://datasheet.ciiva.com:443/pdfs/VipMasterIC/IC/KEME/KEME-S-A0008958426/KEME-S-A0008958426-1.pdf?src-supplier=IHS+Markit, Dielectric Material=Ceramic, Manufacturer Part Number=C0402S221K5RACAUTO, Pins=2, Pricing="1=0.43, 10=0.225, 50=0.225, 100=0.163, 1000=0.127, 10000=0.098 (USD)", Reach SVHC Compliant=Yes, RoHS=Yes, RoHS Compliant=Yes, Stock=19717, Supplier=Mouser
C10: library part C0402C333M4REC7411, "Ceramic Capacitor, Multilayer, Ceramic, 16V, 20% +Tol, 20% -Tol, X7R, 15% TC, 0.033uF, Surface Mount, 0402", Capacitor Type=Ceramic, Manufacturer=KEMET, Supplier Part Number=80-C0402C333M4RECLR, Category="Ceramic Capacitors", ComponentLink1Description=https://datasheet.ciiva.com:443/pdfs/VipMasterIC/IC/KEME/KEME-S-A0008958450/KEME-S-A0008958450-1.pdf?src-supplier=IHS+Markit, ComponentLink1URL=https://datasheet.ciiva.com:443/pdfs/VipMasterIC/IC/KEME/KEME-S-A0008958450/KEME-S-A0008958450-1.pdf?src-supplier=IHS+Markit, ComponentLink2Description=https://api.kemet.com/component-edge/download/datasheet/C0402C333M4REC7411.pdf?src-supplier=Digikey, ComponentLink2URL=https://api.kemet.com/component-edge/download/datasheet/C0402C333M4REC7411.pdf?src-supplier=Digikey, Dielectric Material=Ceramic, Manufacturer Part Number=C0402C333M4REC7411, Pins=2, Pricing="1=0.1, 10=0.059, 50=0.059, 100=0.036, 1000=0.026, 10000=0.018 (USD)", Reach SVHC Compliant=Yes, RoHS=Yes, RoHS Compliant=Yes, Stock=47561, Supplier=Mouser
C11 C35: library part C0402C224K9PAC7411, "Ceramic Capacitor, Multilayer, Ceramic, 6.3V, 10% +Tol, 10% -Tol, X5R, 15% TC, 0.22uF, Surface Mount, 0402", Capacitor Type=Ceramic, Case/Package=0402, Manufacturer=KEMET, Max Operating Temperature=85°C, Min Operating Temperature=-55°C, Package Shape=Rectangular, Package Style=SMTMeter, Rated DC Voltage (URdc)=6.3V, Supplier Part Number=80-C0402C224K9PACLR, Temperature Characteristics Code=X5R, Tolerance  (fill in as +-)=10%, Category="Ceramic Capacitors", ComponentLink1Description=https://datasheet.ciiva.com:443/pdfs/VipMasterIC/IC/KEME/KEME-S-A0008991665/KEME-S-A0008991665-1.pdf?src-supplier=IHS+Markit, ComponentLink1URL=https://datasheet.ciiva.com:443/pdfs/VipMasterIC/IC/KEME/KEME-S-A0008991665/KEME-S-A0008991665-1.pdf?src-supplier=IHS+Markit, ComponentLink2Description=http://capacitoredge.kemet.com/capedge2/DataSheet?pn=C0402C224K9PAC7411&src-supplier=Avnet, ComponentLink2URL=http://capacitoredge.kemet.com/capedge2/DataSheet?pn=C0402C224K9PAC7411&src-supplier=Avnet, ComponentLink3Description=https://datasheet.octopart.com/C0402C224K9PAC7411-KEMET-datasheet-182899637.pdf?src-supplier=Farnell, ComponentLink3URL=https://datasheet.octopart.com/C0402C224K9PAC7411-KEMET-datasheet-182899637.pdf?src-supplier=Farnell, Dielectric Material=Ceramic, Height=0.5mm, JESD-609 Code=e3, Length=1mm, Manufacturer Part Number=C0402C224K9PAC7411, Mounting Technology="Surface Mount", Multilayer=Yes, Packaging="Tape and Reel", Pins=2, Pricing="1=0.1, 10=0.018, 50=0.018, 100=0.015, 1000=0.015, 10000=0.015 (USD)", Reach SVHC Compliant=Yes, RoHS=Yes, RoHS Compliant=Yes, Stock=143956, Supplier=Mouser, Terminal Finish=Nickel, Termination=Wraparound, Tolerance (fill in as +-)=10%, Width=0.5mm
C12: library part GRM21BR60J106KE19L, "Ceramic Capacitor, Multilayer, Ceramic, 6.3V, 10% +Tol, 10% -Tol, X5R, 15% TC, 10uF, Surface Mount, 0805", Capacitor Type=Ceramic, Case/Package=0805, Manufacturer=Murata, Max Operating Temperature=85°C, Min Operating Temperature=-55°C, Package Shape=Rectangular, Package Style=SMTMeter, Rated DC Voltage (URdc)=6.3V, Temperature Characteristics Code=X5R, Tolerance  (fill in as +-)=10%, Category="Ceramic Capacitors", ComponentLink1Description=https://datasheet.ciiva.com:443/pdfs/VipMasterIC/IC/MURE/MURE-S-A0004349797/MURE-S-A0004361791-1.pdf?src-supplier=IHS+Markit, ComponentLink1URL=https://datasheet.ciiva.com:443/pdfs/VipMasterIC/IC/MURE/MURE-S-A0004349797/MURE-S-A0004361791-1.pdf?src-supplier=IHS+Markit, ComponentLink2Description=https://datasheet.ciiva.com/3777/131grm21br60j106ke1923-3777038.pdf?src-supplier=Arrow+Electronics, ComponentLink2URL=https://datasheet.ciiva.com/3777/131grm21br60j106ke1923-3777038.pdf?src-supplier=Arrow+Electronics, ComponentLink3Description=https://datasheet.ciiva.com/136/product-136502.pdf?src-supplier=Digikey, ComponentLink3URL=https://datasheet.ciiva.com/136/product-136502.pdf?src-supplier=Digikey, ComponentLink4Description=https://datasheet.ciiva.com/19476/1858851-19476205.pdf?src-supplier=Jameco, ComponentLink4URL=https://datasheet.ciiva.com/19476/1858851-19476205.pdf?src-supplier=Jameco, ComponentLink5Description=https://datasheet.ciiva.com/7719/608985-7719084.pdf?src-supplier=Element14, ComponentLink5URL=https://datasheet.ciiva.com/7719/608985-7719084.pdf?src-supplier=Element14, ComponentLink6Description=https://datasheet.ciiva.com/136/product-136500.pdf?src-supplier=Digikey, ComponentLink6URL=https://datasheet.ciiva.com/136/product-136500.pdf?src-supplier=Digikey, ComponentLink7Description=https://datasheet.ciiva.com/136/product-136501.pdf?src-supplier=Digikey, ComponentLink7URL=https://datasheet.ciiva.com/136/product-136501.pdf?src-supplier=Digikey, Dielectric Material=Ceramic, Height=1.25mm, JESD-609 Code=e3, Length=2mm, Manufacturer Part Number=GRM21BR60J106KE19L, Mounting Technology="Surface Mount", Multilayer=Yes, Packaging="Tape and Reel", Pins=2, Pricing="3000=0.0427, 9000=0.0414, 24000=0.037, 45000=0.0357 (USD)", Reach SVHC Compliant=Yes, RoHS=Yes, RoHS Compliant=Yes, Stock=462000, Supplier="Arrow Electronics", Supplier Part Number=GRM21BR60J106KE19L, Terminal Finish=Nickel, Termination=Wraparound, Tolerance (fill in as +-)=10%, Width=1.25mm
C13: library part 4SVP33M, "Aluminum Electrolytic Capacitor, Polarized, Aluminum (solid Polymer), 4V, 20% +Tol, 20% -Tol, 33uF, Surface Mount, 1717", Capacitor Type=Aluminium, Case/Package=1717, ESR (Equivalent Series Resistance)=200mR, Leakage Current=66uA, Manufacturer=Panasonic, Manufacturer Series=SVP, Max Operating Temperature=105°C, Min Operating Temperature=-55°C, Package Shape=Cylindrical, Package Style=SMTMeter, Rated DC Voltage (URdc)=4V, Ripple Current=37mA, Supplier Part Number=667-4SVP33M, Tolerance  (fill in as +-)=20%, Category="Aluminum Electrolytic Capacitors", ComponentLink1Description=https://datasheet.ciiva.com:443/pdfs/VipMasterIC/IC/PANA/PANA-S-A0009016943/PANA-S-A0009016943-1.pdf?src-supplier=IHS+Markit, ComponentLink1URL=https://datasheet.ciiva.com:443/pdfs/VipMasterIC/IC/PANA/PANA-S-A0009016943/PANA-S-A0009016943-1.pdf?src-supplier=IHS+Markit, ComponentLink2Description=https://datasheet.ciiva.com/24477/svp-series-datasheet-24477337.pdf?src-supplier=Onlinecomponents.com, ComponentLink2URL=https://datasheet.ciiva.com/24477/svp-series-datasheet-24477337.pdf?src-supplier=Onlinecomponents.com, Dielectric Material=Aluminium, Height=5.4mm, Length=5mm, Manufacturer Part Number=4SVP33M, Mounting Technology="Surface Mount", Packaging="Tape and Reel", Pins=2, Polarity=Polarized, Pricing="1=0.67, 10=0.519, 50=0.519, 100=0.508, 1000=0.44, 10000=0.362 (USD)", Reach SVHC Compliant=Yes, RoHS=Yes, RoHS Compliant=Yes, Series=SVP, Stock=1637, Supplier=Mouser, Tan Delta=0.15, Termination=Flat, Tolerance (fill in as +-)=20%, Width=4.3mm
C14: library part C0402C271J5GAC7411, "Ceramic Capacitor, Multilayer, Ceramic, 50V, 5% +Tol, 5% -Tol, C0G, 30ppm/Cel TC, 0.00027uF, Surface Mount, 0402", Capacitor Type=Ceramic, Case/Package=0402, Manufacturer=KEMET, Max Operating Temperature=125°C, Min Operating Temperature=-55°C, Package Shape=Rectangular, Package Style=SMTMeter, Rated DC Voltage (URdc)=50V, Supplier Part Number=80-C0402C271J5G7411, Temperature Characteristics Code=C0G, Tolerance  (fill in as +-)=5%, Category="Ceramic Capacitors", ComponentLink1Description=https://datasheet.ciiva.com:443/pdfs/VipMasterIC/IC/KEME/KEME-S-A0005605168/KEME-S-A0005605168-1.pdf?src-supplier=IHS+Markit, ComponentLink1URL=https://datasheet.ciiva.com:443/pdfs/VipMasterIC/IC/KEME/KEME-S-A0005605168/KEME-S-A0005605168-1.pdf?src-supplier=IHS+Markit, Dielectric Material=Ceramic, Height=0.5mm, JESD-609 Code=e3, Length=1mm, Manufacturer Part Number=C0402C271J5GAC7411, Mounting Technology="Surface Mount", Multilayer=Yes, Packaging="Tape and Reel", Pins=2, Pricing="1=0.1, 10=0.018, 50=0.018, 100=0.011, 1000=0.008, 10000=0.007 (USD)", Reach SVHC Compliant=Yes, RoHS=Yes, RoHS Compliant=Yes, Stock=143215, Supplier=Mouser, Terminal Finish=Nickel, Termination=Wraparound, Tolerance (fill in as +-)=5%, Width=0.5mm
C17 C19: library part C0402T103K4RALTU, "Ceramic Capacitor, Multilayer, Ceramic, 16V, 10% +Tol, 10% -Tol, X7R, 15% TC, 0.01uF, Surface Mount, 0402", Capacitor Type=Ceramic, Case/Package=0402, Manufacturer=KEMET, Max Operating Temperature=125°C, Min Operating Temperature=-55°C, Package Shape=Rectangular, Package Style=SMTMeter, Rated DC Voltage (URdc)=16V, Supplier Part Number=80-C0402T103K4RALTU, Temperature Characteristics Code=X7R, Tolerance  (fill in as +-)=10%, Category="Ceramic Capacitors", ComponentLink1Description=https://datasheet.ciiva.com:443/pdfs/VipMasterIC/IC/KEME/KEME-S-A0008487487/KEME-S-A0008487487-1.pdf?src-supplier=IHS+Markit, ComponentLink1URL=https://datasheet.ciiva.com:443/pdfs/VipMasterIC/IC/KEME/KEME-S-A0008487487/KEME-S-A0008487487-1.pdf?src-supplier=IHS+Markit, ComponentLink2Description=https://datasheet.ciiva.com/15379/kem-c1027-x7r-cots-smd-15379193.pdf?src-supplier=Mouser, ComponentLink2URL=https://datasheet.ciiva.com/15379/kem-c1027-x7r-cots-smd-15379193.pdf?src-supplier=Mouser, ComponentLink3Description=https://datasheet.ciiva.com/148/kem-c1027-x7r-cots-smd-148853.pdf?src-supplier=Digikey, ComponentLink3URL=https://datasheet.ciiva.com/148/kem-c1027-x7r-cots-smd-148853.pdf?src-supplier=Digikey, ComponentLink4Description=https://datasheet.ciiva.com/148/kem-c1027-x7r-cots-smd-148851.pdf?src-supplier=Digikey, ComponentLink4URL=https://datasheet.ciiva.com/148/kem-c1027-x7r-cots-smd-148851.pdf?src-supplier=Digikey, ComponentLink5Description=https://datasheet.ciiva.com/148/kem-c1027-x7r-cots-smd-148852.pdf?src-supplier=Digikey, ComponentLink5URL=https://datasheet.ciiva.com/148/kem-c1027-x7r-cots-smd-148852.pdf?src-supplier=Digikey, Dielectric Material=Ceramic, Height=0.5mm, JESD-609 Code=e0, Length=1mm, Manufacturer Part Number=C0402T103K4RALTU, Mounting Technology="Surface Mount", Multilayer=Yes, Packaging="Tape and Reel", Pins=2, Pricing="1=0.58, 10=0.42, 50=0.42, 100=0.337, 1000=0.294, 10000=0.246 (USD)", Reach SVHC Compliant=No, RoHS=No, RoHS Compliant=No, Stock=17779, Supplier=Mouser, Terminal Finish=Nickel, Termination=Wraparound, Tolerance (fill in as +-)=10%, Width=0.5mm
C18 C20: library part C0402C102J5GACAUTO, "Ceramic Capacitor, Multilayer, Ceramic, 50V, 5% +Tol, 5% -Tol, C0G, 30ppm/Cel TC, 0.001uF, Surface Mount, 0402", Capacitor Type=Ceramic, Case/Package=0402, Manufacturer=KEMET, Max Operating Temperature=125°C, Min Operating Temperature=-55°C, Package Style=SMTMeter, Rated DC Voltage (URdc)=50V, Supplier Part Number=80-C0402C102J5GAUTO, Temperature Characteristics Code=C0G, Tolerance  (fill in as +-)=5%, Category="Ceramic Capacitors", ComponentLink1Description=https://datasheet.ciiva.com:443/pdfs/VipMasterIC/IC/KEME/KEME-S-A0008958445/KEME-S-A0008958445-1.pdf?src-supplier=IHS+Markit, ComponentLink1URL=https://datasheet.ciiva.com:443/pdfs/VipMasterIC/IC/KEME/KEME-S-A0008958445/KEME-S-A0008958445-1.pdf?src-supplier=IHS+Markit, ComponentLink2Description=http://www.farnell.com/datasheets/2750482.pdf?src-supplier=Farnell, ComponentLink2URL=http://www.farnell.com/datasheets/2750482.pdf?src-supplier=Farnell, ComponentLink3Description=https://datasheet.octopart.com/C0402C102J5GACAUTO-KEMET-datasheet-169773461.pdf?src-supplier=Newark, ComponentLink3URL=https://datasheet.octopart.com/C0402C102J5GACAUTO-KEMET-datasheet-169773461.pdf?src-supplier=Newark, ComponentLink4Description=http://www.farnell.com/datasheets/2750482.pdf?src-supplier=Newark, ComponentLink4URL=http://www.farnell.com/datasheets/2750482.pdf?src-supplier=Newark, ComponentLink5Description=https://api.kemet.com/component-edge/download/datasheet/C0402C102J5GACAUTO.pdf?src-supplier=Digikey, ComponentLink5URL=https://api.kemet.com/component-edge/download/datasheet/C0402C102J5GACAUTO.pdf?src-supplier=Digikey, ComponentLink6Description=http://www.kemet.com/docfinder?Partnumber=C0402C102J5GACAUTO&src-supplier=Digikey, ComponentLink6URL=http://www.kemet.com/docfinder?Partnumber=C0402C102J5GACAUTO&src-supplier=Digikey, ComponentLink7Description=https://datasheet.octopart.com/C0402C102J5GACAUTO-KEMET-datasheet-130259044.pdf?src-supplier=TME, ComponentLink7URL=https://datasheet.octopart.com/C0402C102J5GACAUTO-KEMET-datasheet-130259044.pdf?src-supplier=TME, Dielectric Material=Ceramic, Height=0.5mm, JESD-609 Code=e3, Length=1mm, Manufacturer Part Number=C0402C102J5GACAUTO, Mounting Technology="Surface Mount", Multilayer=Yes, Packaging="Tape and Reel", Pins=2, Pricing="1=0.12, 10=0.048, 50=0.048, 100=0.032, 1000=0.024, 10000=0.019 (USD)", Reach SVHC Compliant=Yes, Reference Standard=AEC-Q200, RoHS=Yes, RoHS Compliant=Yes, Stock=231451, Supplier=Mouser, Terminal Finish=Nickel, Tolerance (fill in as +-)=5%, Width=0.5mm
C25 C27 C39: library part EXV106M050A9GAA, "Aluminum Electrolytic Capacitor, Polarized, Aluminum (wet), 50V, 20% +Tol, 20% -Tol, 10uF, Surface Mount, 2626", Capacitor Type=Aluminium, Case/Package=2626, ESR (Equivalent Series Resistance)=2.6R, Leakage Current=5uA, Manufacturer=KEMET, Max Operating Temperature=105°C, Min Operating Temperature=-55°C, Package Shape=Cylindrical, Package Style=SMTMeter, Rated DC Voltage (URdc)=50V, Ripple Current=98mA, Supplier Part Number=80-EXV106M050A9GAA, Tolerance  (fill in as +-)=20%, Category="Aluminum Electrolytic Capacitors", ComponentLink1Description=https://datasheet.ciiva.com:443/pdfs/VipMasterIC/IC/KEME/KEME-S-A0009591402/KEME-S-A0009591402-1.pdf?src-supplier=IHS+Markit, ComponentLink1URL=https://datasheet.ciiva.com:443/pdfs/VipMasterIC/IC/KEME/KEME-S-A0009591402/KEME-S-A0009591402-1.pdf?src-supplier=IHS+Markit, ComponentLink2Description=https://datasheet.ciiva.com/22698/1500293-22698078.pdf?src-supplier=Element14, ComponentLink2URL=https://datasheet.ciiva.com/22698/1500293-22698078.pdf?src-supplier=Element14, Dielectric Material=Aluminium, Height=5.4mm, Length=7.8mm, Manufacturer Part Number=EXV106M050A9GAA, Mounting Technology="Surface Mount", Packaging="Tape and Reel", Pins=2, Polarity=Polarized, Pricing="1=0.48, 10=0.255, 50=0.255, 100=0.165, 1000=0.139, 10000=0.112 (USD)", Reach SVHC Compliant=Yes, RoHS=Yes, RoHS Compliant=Yes, Stock=17264, Supplier=Mouser, Tan Delta=0.12, Termination=Flat, Tolerance (fill in as +-)=20%, Width=6.6mm
C38: library part C0402C472J4JACAUTO, "Cap Ceramic 0.0047uF 16V U2J 5% Pad SMD 0402 125C T/R", Manufacturer=KEMET, Supplier Part Number=80-C0402C472J4JAUTO, Category="Ceramic Capacitors", Manufacturer Part Number=C0402C472J4JACAUTO, Pricing="1=0.48, 10=0.311, 50=0.311, 100=0.216, 1000=0.162, 10000=0.112 (USD)", RoHS=No, Stock=12001, Supplier=Mouser
C42: library part C0402C223J5RACTU, "Ceramic Capacitor, Multilayer, Ceramic, 50V, 5% +Tol, 5% -Tol, X7R, 15% TC, 0.022uF, Surface Mount, 0402", Capacitor Type=Ceramic, Case/Package=0402, Manufacturer=KEMET, Max Operating Temperature=125°C, Min Operating Temperature=-55°C, Package Shape=Rectangular, Package Style=SMTMeter, Rated DC Voltage (URdc)=50V, Supplier Part Number=80-C0402C223J5RACTU, Temperature Characteristics Code=X7R, Tolerance  (fill in as +-)=5%, Category="Ceramic Capacitors", ComponentLink1Description=https://datasheet.ciiva.com:443/pdfs/VipMasterIC/IC/KEME/KEME-S-A0008991654/KEME-S-A0008991654-1.pdf?src-supplier=IHS+Markit, ComponentLink1URL=https://datasheet.ciiva.com:443/pdfs/VipMasterIC/IC/KEME/KEME-S-A0008991654/KEME-S-A0008991654-1.pdf?src-supplier=IHS+Markit, ComponentLink2Description=http://capacitoredge.kemet.com/capedge2/DataSheet?pn=C0402C223J5RAC7867&src-supplier=Avnet, ComponentLink2URL=http://capacitoredge.kemet.com/capedge2/DataSheet?pn=C0402C223J5RAC7867&src-supplier=Avnet, Dielectric Material=Ceramic, Height=0.5mm, JESD-609 Code=e3, Length=1mm, Manufacturer Part Number=C0402C223J5RACTU, Mounting Technology="Surface Mount", Multilayer=Yes, Packaging="Tape and Reel", Pins=2, Pricing="1=0.3, 10=0.185, 50=0.185, 100=0.12, 1000=0.087, 10000=0.063 (USD)", Reach SVHC Compliant=Yes, RoHS=Yes, RoHS Compliant=Yes, Stock=18324, Supplier=Mouser, Terminal Finish=Nickel, Termination=Wraparound, Tolerance (fill in as +-)=5%, Width=0.5mm
C43 C45: library part C0402C200F5GACTU, "Ceramic Capacitor, Multilayer, Ceramic, 50V, 1% +Tol, 1% -Tol, C0G, 30ppm/Cel TC, 0.00002uF, Surface Mount, 0402", Capacitor Type=Ceramic, Case/Package=0402, Manufacturer=KEMET, Max Operating Temperature=125°C, Min Operating Temperature=-55°C, Package Style=SMTMeter, Rated DC Voltage (URdc)=50V, Supplier Part Number=80-C0402C200F5GACTU, Temperature Characteristics Code=C0G, Tolerance  (fill in as +-)=1%, Category="Ceramic Capacitors", ComponentLink1Description=https://datasheet.ciiva.com:443/pdfs/VipMasterIC/IC/KEME/KEME-S-A0005605168/KEME-S-A0005605168-1.pdf?src-supplier=IHS+Markit, ComponentLink1URL=https://datasheet.ciiva.com:443/pdfs/VipMasterIC/IC/KEME/KEME-S-A0005605168/KEME-S-A0005605168-1.pdf?src-supplier=IHS+Markit, ComponentLink2Description=https://datasheet.octopart.com/C0402C200F5GACTU-KEMET-datasheet-149534727.pdf?src-supplier=Farnell, ComponentLink2URL=https://datasheet.octopart.com/C0402C200F5GACTU-KEMET-datasheet-149534727.pdf?src-supplier=Farnell, Dielectric Material=Ceramic, Height=0.5mm, JESD-609 Code=e3, Length=1mm, Manufacturer Part Number=C0402C200F5GACTU, Multilayer=Yes, Packaging="Tape and Reel", Pins=2, Pricing="1=1.33, 10=0.87, 50=0.87, 100=0.549, 1000=0.477, 10000=0.408 (USD)", Reach SVHC Compliant=Yes, RoHS=Yes, RoHS Compliant=Yes, Stock=12657, Supplier=Mouser, Terminal Finish=Nickel, Tolerance (fill in as +-)=1%, Width=0.5mm
C53 C54: library part C0402C101K3RACAUTO, "Multilayer Ceramic Capacitors MLCC - SMD/SMT 25V 100pF X7R 0402 10% AEC-Q200", Manufacturer=KEMET, Supplier Part Number=80-C0402C101K3RAUTO, Category="Ceramic Capacitors", Manufacturer Part Number=C0402C101K3RACAUTO, Pricing="1=0.1, 10=0.046, 50=0.046, 100=0.028, 1000=0.02, 10000=0.013 (USD)", RoHS=No, Stock=198813, Supplier=Mouser
D1: "Rectifier Diode", Manufacturer=STMicroelectronics, Supplier Part Number=3387295, Category="Rectifier Diodes", Manufacturer Part Number=STPS2L25AFN, Pricing="1=1 (EUR)", RoHS=Yes, Stock=3, Supplier=Farnell
D2: "Rectifier Diode, Schottky, 1 Phase, 1 Element, 1A, 20V V(RRM), Silicon, DO-222AA", Case Connection=CATHODE, Forward Voltage=410mV, Manufacturer=STMicroelectronics, Max Operating Temperature=150°C, Max Output current=1A, Non-rep Pk Forward Current-Max=50A, Package Body Material=Plastic, Package Shape=Rectangular, Package Style="SMALL OUTLINEMeter", Rep Pk Reverse Voltage-Max=20V, Supplier Part Number=511-STPS120MF, Category="Rectifier Diodes", ComponentLink1Description=https://datasheet.ciiva.com:443/pdfs/VipMasterIC/IC/SGST/SGST-S-A0001365098/SGST-S-A0001365098-1.pdf?src-supplier=IHS+Markit, ComponentLink1URL=https://datasheet.ciiva.com:443/pdfs/VipMasterIC/IC/SGST/SGST-S-A0001365098/SGST-S-A0001365098-1.pdf?src-supplier=IHS+Markit, ComponentLink2Description=https://datasheet.ciiva.com/4714/cd00198749-86002-4714686.pdf?src-supplier=Mouser, ComponentLink2URL=https://datasheet.ciiva.com/4714/cd00198749-86002-4714686.pdf?src-supplier=Mouser, ComponentLink3Description=https://datasheet.ciiva.com/16491/cd00198749-16491507.pdf?src-supplier=Future+Electronics, ComponentLink3URL=https://datasheet.ciiva.com/16491/cd00198749-16491507.pdf?src-supplier=Future+Electronics, ComponentLink4Description=https://datasheet.ciiva.com/916/cd00198749-916327.pdf?src-supplier=Digikey, ComponentLink4URL=https://datasheet.ciiva.com/916/cd00198749-916327.pdf?src-supplier=Digikey, ComponentLink5Description=https://datasheet.ciiva.com/916/cd00198749-916328.pdf?src-supplier=Digikey, ComponentLink5URL=https://datasheet.ciiva.com/916/cd00198749-916328.pdf?src-supplier=Digikey, ComponentLink6Description=https://datasheet.ciiva.com/916/cd00198749-916329.pdf?src-supplier=Digikey, ComponentLink6URL=https://datasheet.ciiva.com/916/cd00198749-916329.pdf?src-supplier=Digikey, Diode Element Material=SILICON, Diode Type=RECTIFIER, JESD-30 Code=R-PDSO-F2, Manufacturer Part Number=STPS120MF, Number of Elements=1, Pins=2, Pricing="1=0.28, 10=0.18, 50=0.18, 100=0.118, 1000=0.092, 10000=0.084 (USD)", Qualification Status="Not Qualified", Reach SVHC Compliant=Yes, RoHS=Yes, RoHS Compliant=Yes, Stock=19149, Supplier=Mouser, Surface Mount=Yes, Technology=SCHOTTKY, Terminal Form=Flat, Terminal Position=DUAL
D3: library part 1N5819HW-7-F, "Rectifier Diode, Schottky, 1 Phase, 1 Element, 1A, 40V V(RRM), Silicon", Forward Voltage=320mV, Manufacturer=Diodes, Max Operating Temperature=125°C, Max Output current=1A, Max Power Dissipation=450mW, Min Operating Temperature=-65°C, Non-rep Pk Forward Current-Max=25A, Package Body Material=Plastic, Package Shape=Rectangular, Package Style="SMALL OUTLINEMeter", Peak Reflow Temperature (Cel)=260°C, Rep Pk Reverse Voltage-Max=40V, Supplier Part Number=621-1N5819HW-F, Time @ Peak Reflow Temperature-Max (s)=40s, Category="Schottky Diodes", ComponentLink1Description=https://datasheet.ciiva.com:443/pdfs/VipMasterIC/IC/DIOD/DIOD-S-A0009689747/DIOD-S-A0009691035-1.pdf?src-supplier=IHS+Markit, ComponentLink1URL=https://datasheet.ciiva.com:443/pdfs/VipMasterIC/IC/DIOD/DIOD-S-A0009689747/DIOD-S-A0009691035-1.pdf?src-supplier=IHS+Markit, ComponentLink2Description=https://datasheet.ciiva.com/27092/1538419-27092484.pdf?src-supplier=Jameco, ComponentLink2URL=https://datasheet.ciiva.com/27092/1538419-27092484.pdf?src-supplier=Jameco, ComponentLink3Description=https://datasheet.ciiva.com/16303/ds30217-16303296.pdf?src-supplier=Future+Electronics, ComponentLink3URL=https://datasheet.ciiva.com/16303/ds30217-16303296.pdf?src-supplier=Future+Electronics, ComponentLink4Description=https://datasheet.ciiva.com/1177/ds30217-1177089.pdf?src-supplier=Element14, ComponentLink4URL=https://datasheet.ciiva.com/1177/ds30217-1177089.pdf?src-supplier=Element14, ComponentLink5Description=https://datasheet.ciiva.com/8303/ds30217-8303132.pdf?src-supplier=Avnet, ComponentLink5URL=https://datasheet.ciiva.com/8303/ds30217-8303132.pdf?src-supplier=Avnet, ComponentLink6Description=https://datasheet.ciiva.com/912/ds30217-912802.pdf?src-supplier=Digikey, ComponentLink6URL=https://datasheet.ciiva.com/912/ds30217-912802.pdf?src-supplier=Digikey, ComponentLink7Description=https://datasheet.ciiva.com/912/ds30217-912803.pdf?src-supplier=Digikey, ComponentLink7URL=https://datasheet.ciiva.com/912/ds30217-912803.pdf?src-supplier=Digikey, ComponentLink8Description=https://datasheet.ciiva.com/912/ds30217-912801.pdf?src-supplier=Digikey, ComponentLink8URL=https://datasheet.ciiva.com/912/ds30217-912801.pdf?src-supplier=Digikey, Diode Element Material=SILICON, Diode Type=RECTIFIER, JESD-30 Code=R-PDSO-G2, JESD-609 Code=e3, Manufacturer Part Number=1N5819HW-7-F, Moisture Sensitivity Level=1, Number of Elements=1, Pins=2, Pricing="1=0.25, 10=0.168, 50=0.168, 100=0.121, 1000=0.091, 10000=0.05 (USD)", Qualification Status="Not Qualified", Reach SVHC Compliant=Yes, RoHS=Yes, RoHS Compliant=Yes, Stock=170615, Supplier=Mouser, Surface Mount=Yes, Technology=SCHOTTKY, Terminal Finish=Tin, Terminal Form="Gull Wing", Terminal Position=DUAL